# EAGLE board Knight Rider LEDs (EAGLE 9.7.0)
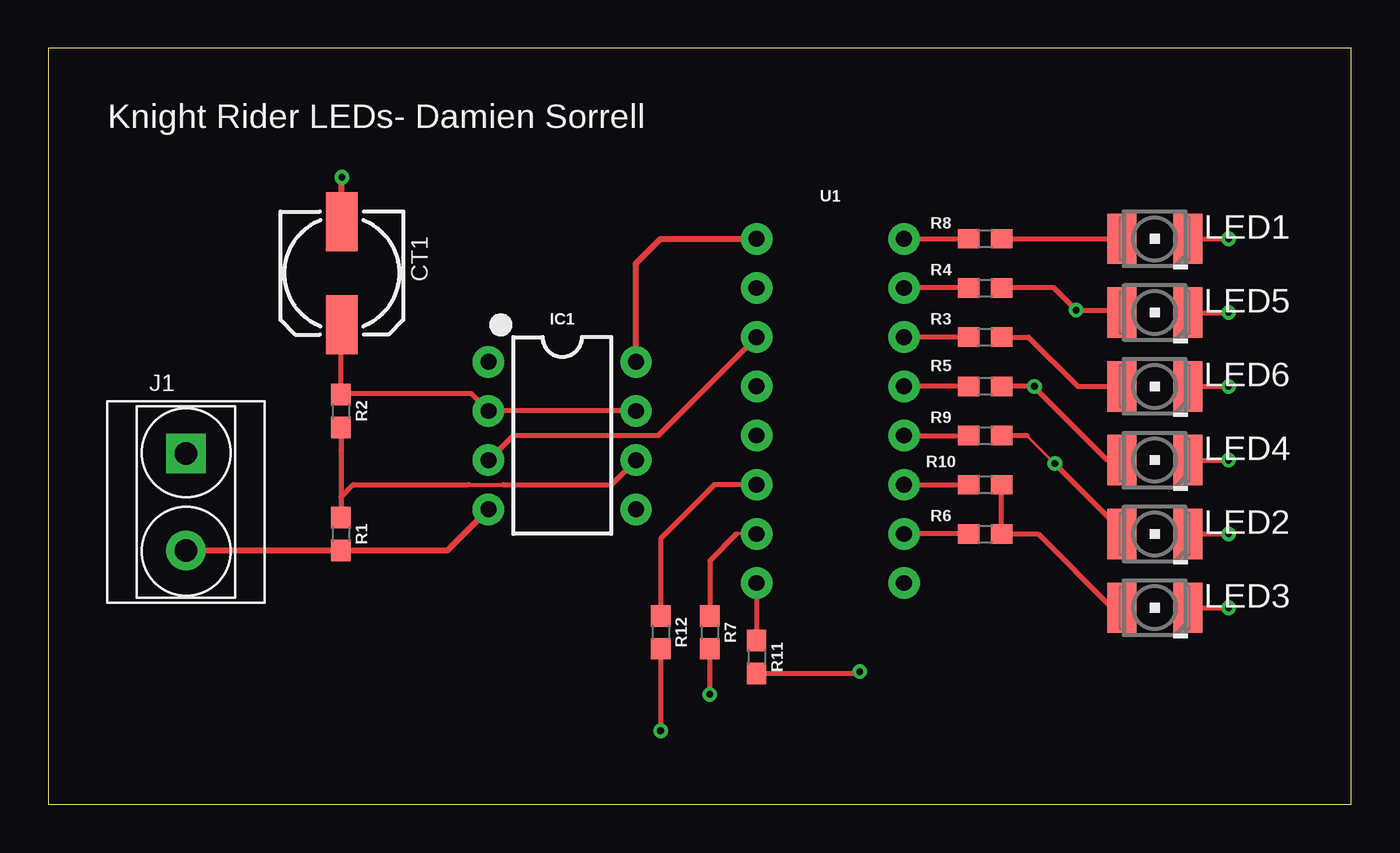
[diagram p0: board, top side]
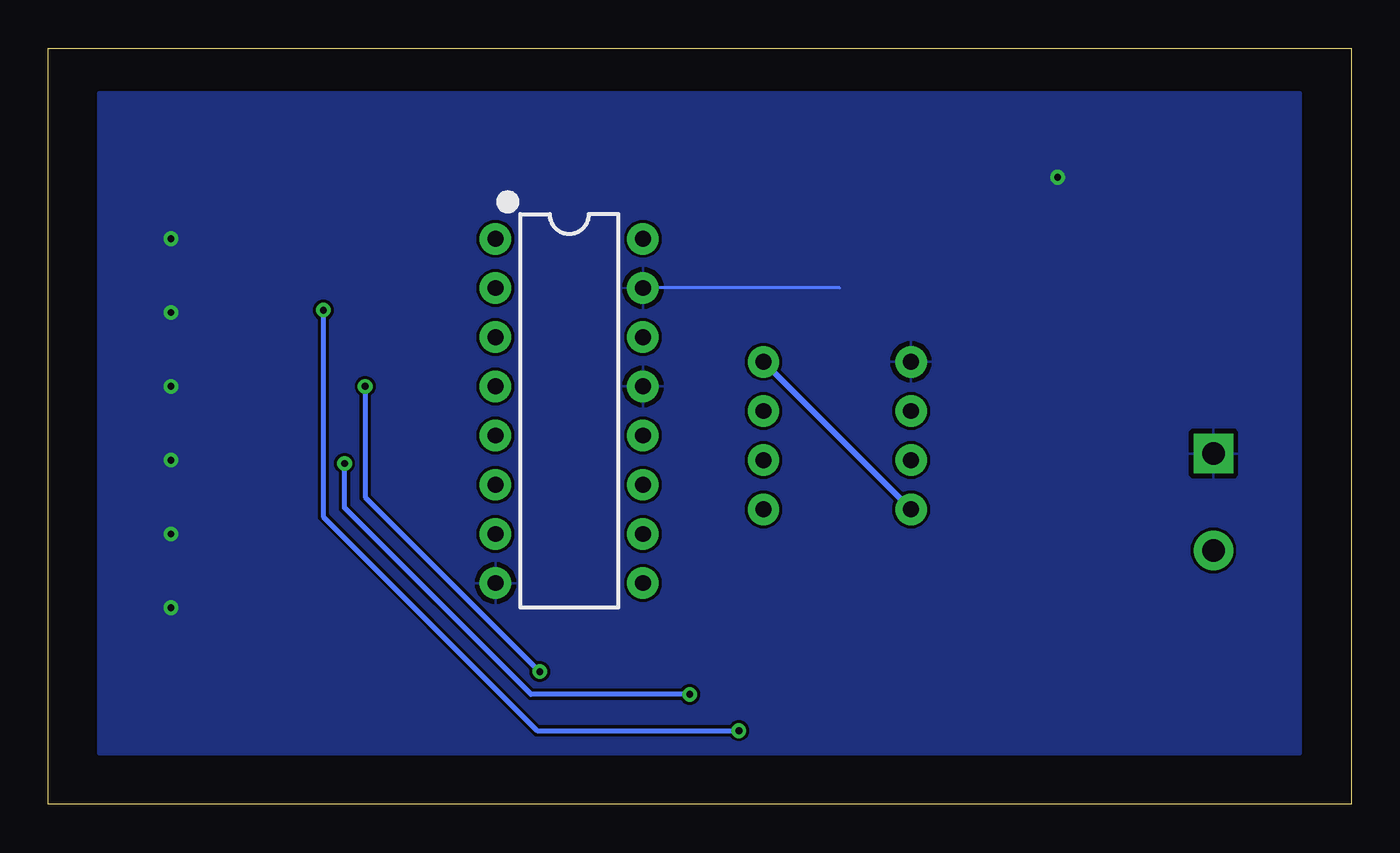
[diagram p1: board, bottom side, seen from below]

Size 67.29 x 39.04 mm. Coordinates in mm from the lower left corner, seen from the top.
Outline: 0,0 67.29,0 67.29,39.04 0,39.04 0,0
Copper layers (1*16): Top / Bottom
Stack-up Default Layer Stack: Top SilkScreen Epoxy Ink / Top SolderMask SR:Green 0.0254mm Dk 4.3 / Top Surface Finish Lead-Free 0.02mm / Top CuFoil:007 0.035mm / Dielectric-1 User Defined 1.5mm / Bottom CuFoil:007 0.035mm / Bottom Surface Finish Lead-Free 0.02mm / Bottom SolderMask SR:Green 0.0254mm Dk 4.3 / Bottom SilkScreen Epoxy Ink
Design rules: minimum copper width 6mil, minimum drill size 0.35mm, copper clearance wire_polygon to wire_polygon 6mil, copper clearance wire_polygon to pad_smd 6mil, copper clearance wire_polygon to via 6mil, copper clearance pad_smd to pad_smd 6mil, copper clearance pad_smd to via 6mil, copper clearance via to via 6mil, copper clearance smd to pad (same net) 6mil, copper clearance smd to via (same net) 6mil, copper clearance smd to smd (same net) 6mil, dimension clearance 40mil, restrict clearance 0mil, via restrict clearance 0mil, drill distance 6mil, keepout clearance 0mil

## Footprints (pad centres in the part's own frame; a part is rotated, then mirrored left to right if it is on the bottom)
ELECTRO-SMD-C-6MM = smd 3.048 x 1.651: + 2.667,0; - -2.667,0
DIP08 = drill 0.813 pad 1.626: 1 -3.81,-3.81; 2 -1.27,-3.81; 3 1.27,-3.81; 4 3.81,-3.81; 5 3.81,3.81; 6 1.27,3.81; 7 -1.27,3.81; 8 -3.81,3.81
H2-5.0-10.5X8.0MM = drill 1.168 pad 2.032 square: 1 0,2.5 | drill 1.168 pad 2.032: 2 0,-2.5
PLCC2 = smd 2.6 x 1.5: A 0,1.7; C 0,-1.7
0603 = smd 1.1 x 1: 1 -0.85,0; 2 0.85,0
DIP16 = drill 0.813 pad 1.626: 1 -8.89,-3.81; 2 -6.35,-3.81; 3 -3.81,-3.81; 4 -1.27,-3.81; 5 1.27,-3.81; 6 3.81,-3.81; 7 6.35,-3.81; 8 8.89,-3.81; 9 8.89,3.81; 10 6.35,3.81; 11 3.81,3.81; 12 1.27,3.81; 13 -1.27,3.81; 14 -3.81,3.81; 15 -6.35,3.81; 16 -8.89,3.81

## Placement (x,y rotation side)
CT1  33UF  [ELECTRO-SMD-C-6MM]  15.16,27.43 270 top
IC1  555  [DIP08]  26.54,19.05 270 top
J1  GREEN-2P-5.0  [H2-5.0-10.5X8.0MM]  7.11,15.62 0 top
LED1  LS_T679-D2E2-1  [PLCC2]  57.15,29.21 90 top
LED2  LS_T679-D2E2-1  [PLCC2]  57.15,13.97 90 top
LED3  LS_T679-D2E2-1  [PLCC2]  57.15,10.16 90 top
LED4  LS_T679-D2E2-1  [PLCC2]  57.15,17.78 90 top
LED5  LS_T679-D2E2-1  [PLCC2]  57.15,25.4 90 top
LED6  LS_T679-D2E2-1  [PLCC2]  57.15,21.59 90 top
R1  1000  [0603]  15.11,13.97 270 top
R2  1000  [0603]  15.11,20.32 270 top
R3  1500  [0603]  48.39,24.13 0 top
R4  1000  [0603]  48.39,26.67 0 top
R5  1000  [0603]  48.39,21.59 0 top
R6  1000  [0603]  48.39,13.97 0 top
R7  1000  [0603]  34.16,8.89 270 top
R8  1500  [0603]  48.39,29.21 0 top
R9  1000  [0603]  48.39,19.05 0 top
R10  1000  [0603]  48.39,16.51 0 top
R11  1000  [0603]  36.58,7.62 270 top
R12  1000  [0603]  31.62,8.89 270 top
U1  CD4017  [DIP16]  40.39,20.32 270 bottom

## Library data of the parts
CT1 = OPL_Capacitor; MPN: CS1E221M-CRE77
IC1 = SparkFun-IC-Special-Function; PROD_ID: IC-09173; PROD_ID_ALT: IC-09173
J1 = OPL_Connector
LED1-LED6 = led; COLOR: super-red
R1-R12 = SparkFun-Resistors; PROD_ID: RES-12535
U1 = SparkFun-IC-Logic; PROD_ID: IC-11929

## Nets
GROUND: CT1.- IC1.1 J1.1 LED1.C LED2.C LED3.C LED4.C LED5.C LED6.C U1.8 U1.13 U1.15
N$2: IC1.6 R1.1 R2.2
N$3: CT1.+ IC1.2 IC1.7 R2.1
N$5: IC1.3 U1.14
N$6: R7.1 U1.10
N$7: R8.1 U1.1
N$8: R9.1 U1.5
N$9: R10.1 U1.6
N$10: R11.1 U1.9
N$11: R12.1 U1.11
N$12: R3.1 U1.3
N$13: R4.1 U1.2
N$14: R5.1 U1.4
N$15: R6.1 U1.7
N$16: LED6.A R3.2
N$17: LED5.A R4.2 R12.2
N$18: LED4.A R5.2 R11.2
N$19: LED3.A R6.2 R10.2
N$20: LED2.A R7.2 R9.2
N$21: LED1.A R8.2
VCC: IC1.4 IC1.8 J1.2 R1.2 U1.16

## Tracks (layer width: path | path; a pad name or v marks a point on that pad's centre or on a via)
GROUND  (via drill 0.35)
  Top 0.254: LED5.C v60.96,25.4 | v15.16,32.38 v15.16,32.39 | LED1.C v60.96,29.21 | LED6.C v60.96,21.59 | LED4.C v60.96,17.78 | LED2.C v60.96,13.97 | LED3.C v60.96,10.16
  Top 0.305: CT1.- v15.16,32.38
  Bottom 0.152: 26.42,26.67 U1.15
  pour Bottom: 2.54,36.83 64.77,36.83 64.77,2.54 2.54,2.54
N$2
  Top 0.152: R2.2 15.11,19.05
  Top 0.203: 21.72,16.51 23.5,16.51
  Top 0.254: 15.11,19.05 15.11,18.29 15.11,15.88 | 15.11,15.88 R1.1 | 15.11,15.88 15.75,16.51 21.72,16.51 | IC1.6 29.08,16.51 23.5,16.51
N$3
  Top 0.152: 15.11,24.72 CT1.+ | 15.15,21.21 R2.1
  Top 0.254: R2.1 15.11,24.72 | 15.15,21.21 21.84,21.21 IC1.2 IC1.7
N$5
  Top 0.254: IC1.3 24,19.05 31.5,19.05 U1.14
N$6
  Top 0.152: U1.10 35.55,13.97
  Top 0.254: R7.1 34.16,12.58 35.55,13.97
N$7
  Top 0.254: U1.1 R8.1
N$8
  Top 0.254: U1.5 R9.1
N$9
  Top 0.254: U1.6 R10.1
N$10
  Top 0.254: U1.9 R11.1
N$11
  Top 0.254: U1.11 34.42,16.51 31.62,13.72 R12.1
N$12
  Top 0.254: R3.1 U1.3
N$13
  Top 0.254: R4.1 U1.2
N$14
  Top 0.254: R5.1 U1.4
N$15
  Top 0.254: R6.1 U1.7
N$16
  Top 0.254: R3.2 50.62,24.13 53.16,21.59 LED6.A
N$17  (via drill 0.35)
  Top 0.152: 55.32,25.53 LED5.A
  Top 0.254: R4.2 51.94,26.67 v53.09,25.53 55.32,25.53 | R12.2 v31.62,3.81
  Bottom 0.254: v53.09,25.53 53.09,14.86 42.04,3.81 v31.62,3.81
N$18  (via drill 0.35)
  Top 0.152: 41.82,6.77 v41.91,6.86 | LED4.A 54.69,17.78 | 50.93,21.54 v50.93,21.59
  Top 0.254: R11.2 41.82,6.77 | v50.93,21.59 R5.2 | 54.69,17.78 50.93,21.54
  Bottom 0.254: v50.93,21.59 50.93,15.88 v41.91,6.86
N$19
  Top 0.152: 54.94,10.16 LED3.A
  Top 0.254: R10.2 R6.2 51.13,13.97 54.94,10.16
N$20  (via drill 0.35)
  Top 0.152: v51.99,17.61 50.55,19.05 | LED2.A 55.45,14.15
  Top 0.254: 50.55,19.05 R9.2 | 55.45,14.15 v51.99,17.61 | v34.16,5.69 R7.2
  Bottom 0.254: v34.16,5.69 42.36,5.69 51.99,15.32 v51.99,17.61
N$21
  Top 0.254: R8.2 LED1.A
VCC
  Top 0.254: R1.2
  Top 0.305: R1.2 20.61,13.12 IC1.4 | J1.2 R1.2 | IC1.8 30.35,27.94 31.62,29.21 U1.16
  Bottom 0.305: IC1.4 IC1.8

## Text on the board
SilkscreenTop: Knight Rider LEDs- Damien Sorrell